# Altium PCB ControlBoard_PCB.PcbDoc
Units mil, origin at the board's own origin, x right, y up, seen from the top; angles counter-clockwise.
Board outline 1629.92 x 1653.54 mil, 2 copper layers (Top Layer, Bottom Layer), stack 57 mil thick; 80 components, 70 nets, 348 pads, 4 vias.
Unrouted connection lines stored in the file: 222.
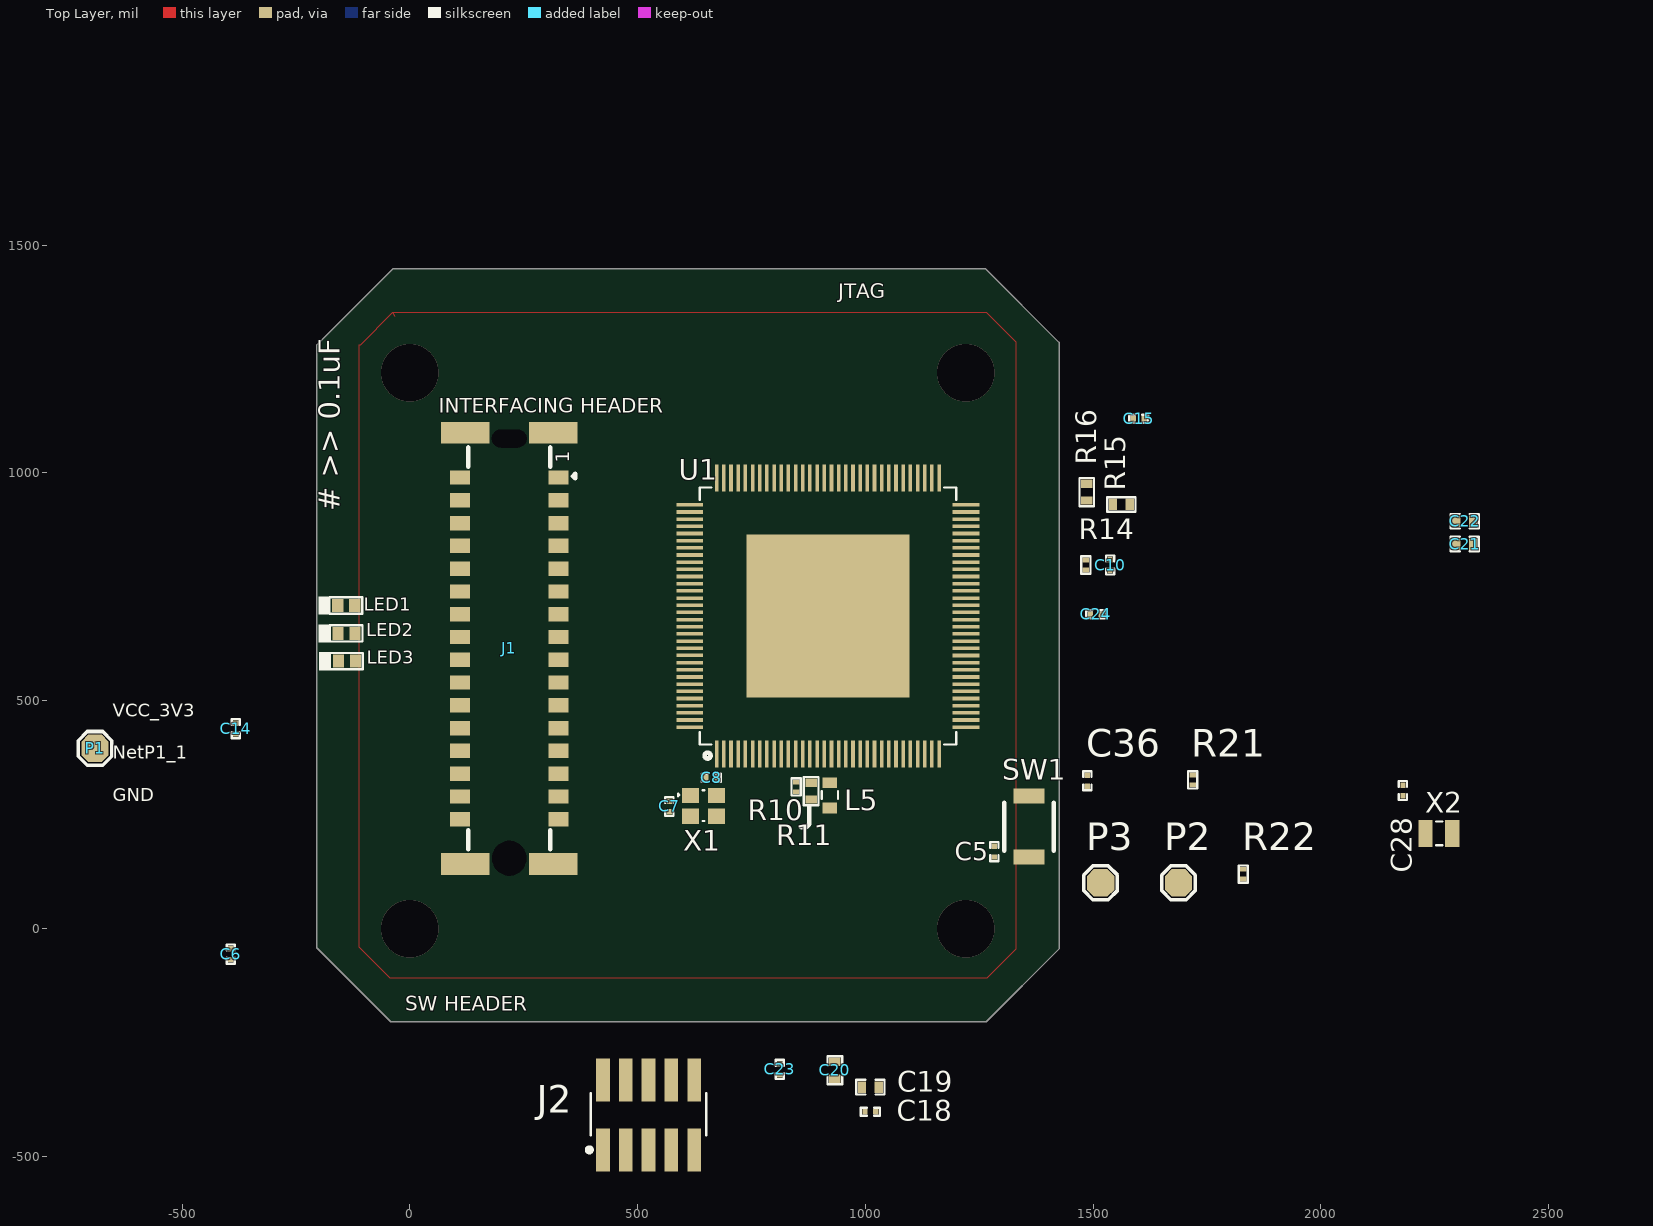
[diagram p0: Top Layer view]
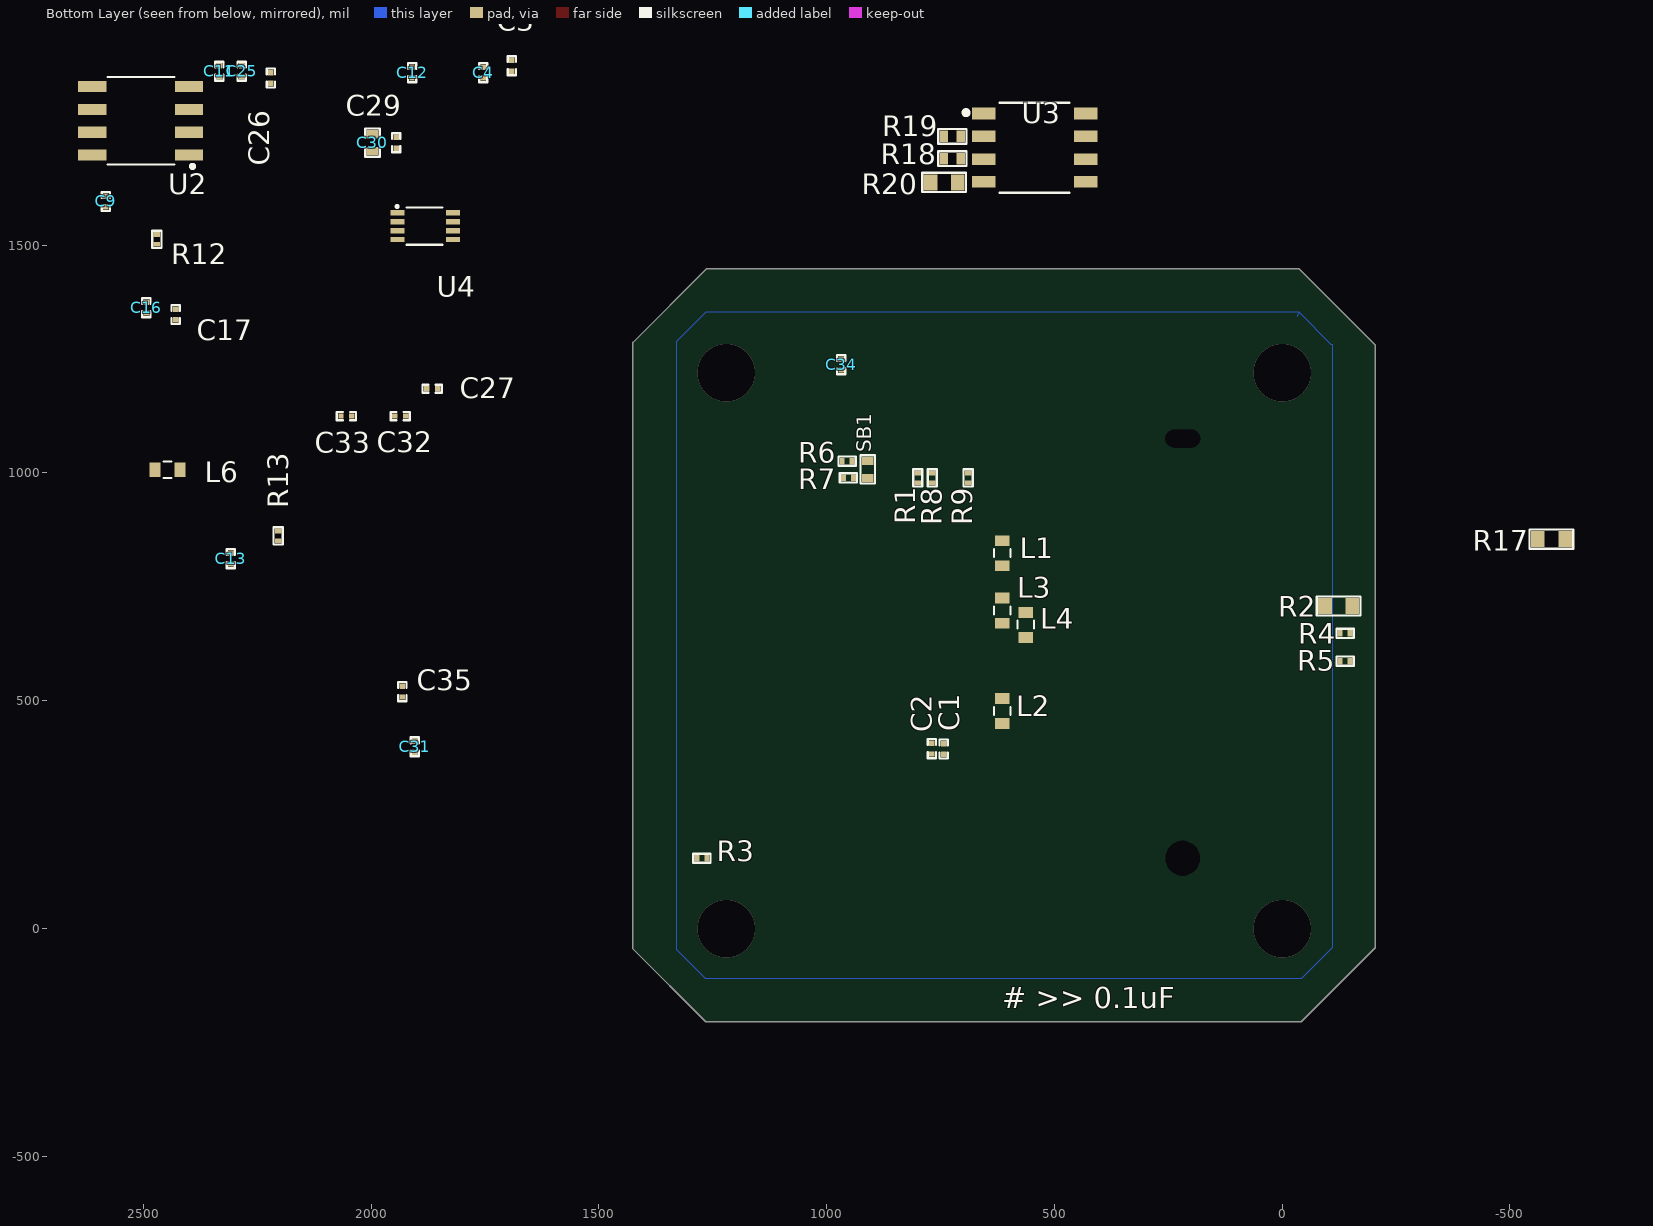
[diagram p1: Bottom Layer view, seen from below]

## Layer stack, top to bottom
Top Solder: solder mask 3, Solder Resist, Dk 3.5
Top Layer: signal copper 10
Dielectric 1: dielectric 37, FR-4, Dk 4.8
Bottom Layer: signal copper 10
Bottom Solder: solder mask 3, Solder Resist, Dk 3.5

## Board outline
-204.72,-43.35 -204.72,1280.28 -36.18,1448.82 1263.11,1448.82 1425.2,1286.73 1425.2,-44.8 1265.28,-204.72 -41.8,-204.72 -203.18,-43.35

## Design rules (kind name [scope] priority, off if disabled: settings)
Clearance Clearance_2 [InDifferentialPairClass('EtherCAT_B_Lines')] p1: gap=7 ignorepadtopadclearanceinfootprint=FALSE except(0: Arc-Hole Track-Hole SMDPad-Hole THPad-Hole Via-Hole Fill-Hole Poly-Hole Region-Hole Text-Hole; 3: Arc-SMDPad Track-SMDPad SMDPad-SMDPad)
Clearance Clearance_1 [InDifferentialPairClass('EtherCAT_A_Lines')] p2: gap=7 ignorepadtopadclearanceinfootprint=FALSE except(0: Arc-Hole Track-Hole SMDPad-Hole THPad-Hole Via-Hole Fill-Hole Poly-Hole Region-Hole Text-Hole; 3: Arc-SMDPad Track-SMDPad SMDPad-SMDPad)
Clearance [All] p3: gap=7 ignorepadtopadclearanceinfootprint=FALSE except(0: Arc-Hole Track-Hole SMDPad-Hole THPad-Hole Via-Hole Fill-Hole Poly-Hole Region-Hole Text-Hole; 3: Arc-SMDPad Track-SMDPad SMDPad-SMDPad)
ComponentClearance [All] p1: gap=4 collisioncheckmode=3 verticalgap=4 showdistances=FALSE
DiffPairsRouting DiffPairsRouting_1 [InDifferentialPairClass('EtherCAT_B_Lines')] p1: maxlimit=10 minlimit=10 mostfreqgap=10 toplayer_minwidth=6 toplayer_maxwidth=22 toplayer_prefwidth=10 bottomlayer_minwidth=6 bottomlayer_maxwidth=22 bottomlayer_prefwidth=10 maxuncoupledlength=500
DiffPairsRouting [InDifferentialPairClass('EtherCAT_A_Lines')] p2: maxlimit=10 minlimit=10 mostfreqgap=10 toplayer_minwidth=6 toplayer_maxwidth=22 toplayer_prefwidth=10 bottomlayer_minwidth=6 bottomlayer_maxwidth=22 bottomlayer_prefwidth=10 maxuncoupledlength=500
HoleSize [All] p1: absolutevalues=TRUE maxlimit=1000 minlimit=1 maxpercent=80.000 minpercent=20.000
HoleToHoleClearance [All] p1: gap=0 allowstackedmicrovias=TRUE
MatchedLengths "Schematic Matched Net Lengths_1" [InNetClass('EtherCAT_A')] p1: tolerance=25.4 checknetsindiffpair=FALSE checkdiffpairvsdiffpair=TRUE checkxsignals=TRUE checkothers=TRUE
MatchedLengths "Schematic Matched Net Lengths" [InNetClass('EtherCAT_B')] p2: tolerance=25.4 checknetsindiffpair=FALSE checkdiffpairvsdiffpair=TRUE checkxsignals=TRUE checkothers=TRUE
MaxMinImpedance "Schematic Impedance Constraint_1" [InNetClass('EtherCAT_A')] p1: minimum=85.00 maximum=95.00
MaxMinImpedance "Schematic Impedance Constraint" [InNetClass('EtherCAT_B')] p2: minimum=85.00 maximum=95.00
MinimumSolderMaskSliver [All] p1: minsoldermaskwidth=0
PolygonConnect [All] p1: connectstyle=Relief reliefconductorwidth=10 reliefentries=4 polygonreliefangle="90 Angle" airgapwidth=10
RoutingVias [All] p1: holewidth=11.81 width=23.62 viastyle="Through Hole" minholewidth=11.81 minwidth=23.62 maxholewidth=11.81 maxwidth=23.62
SilkToSilkClearance [All] p1: silktosilkclearance=0
SilkToSolderMaskClearance [IsPad] p1: minsilkscreentomaskgap=0 clearancetoexposedcopper=TRUE
SolderMaskExpansion SolderMaskExpansion_1 [IsVia] p1: expansion=4 istentingtop=FALSE soldermaskfromhole=TRUE
SolderMaskExpansion [Not IsVia] p2: expansion=4 istentingtop=FALSE
Width [All] p1: maxlimit=40 minlimit=8 preferedwidth=22
23 further rules are at their usual default settings.

## Classes and differential pairs
component class U_Level-Shifter-Selector: C35 C36 R21 U4
component class U_Connector-Sheet: J1 J2 P2 P3 R22
differential pair class EtherCAT_B_Lines: RXB TXB
differential pair class EtherCAT_A_Lines: RXA TXA
net class EtherCAT_B: RXB_N RXB_P TXB_N TXB_P
net class EtherCAT_A: RXA_N RXA_P TXA_N TXA_P
component class U_Encoder-Sheet: C34 R18 R19 R20 U3
component class U_Coltroller-Part2: C32 C33 L6 R12 R13 R14 R15 R16 R17 U2
component class U_Coltroller-Part1: 42 C1 C2 C3 C4 C5 C6 C7 C8 C9 C10 C11 C12 C13 C14 C15 C16 C17 C18 C19 C20 C21 C22 C23 C24 C25 C26 C27 C29 C30 C31 L1 L2 L3 L4 L5 LED1 LED3 P1 R1 R2 R3 R4 R5 R6 R7 R8 R9 R10 R11 SB1 SW1 U1
differential pair TXB: +TXB_P -TXB_N
differential pair TXA: +TXA_P -TXA_N
differential pair RXB: +RXB_P -RXB_N
differential pair RXA: +RXA_P -RXA_N

## Components (designator, comment, footprint, x,y, rotation, side; value= is the part's Value field where it differs from the comment)
C1 "1uF" Cap-0201 743,394.19 r90 bottom
C2 "100nF" CAP-0201 769,395 r90 bottom
C3 "1uF" Cap-0201 1691,1894 r90 bottom
C4 "100nF" CAP-0201 1753.72,1879 r90 bottom
C5 "100nF" CAP-0201 1283,169 r90 top
C6 "1uF" Cap-0201 -393,-56.12 r270 top
C7 "10pF" CAP-0201 570,268 r270 top
C8 "10pF" CAP-0201 661.81,331 r0 top
C9 "100nF" CAP-0201 2582,1596 r90 bottom
C10 "100nF" CAP-0201 1537,798 r270 top
C11 "100nF" CAP-0201 2333,1882 r270 bottom
C12 "100nF" CAP-0201 1910,1879 r270 bottom
C13 "100nF" CAP-0201 2308,812 r90 bottom
C14 "100nF" CAP-0201 -382,439 r90 top
C15 "100nF" CAP-0201 1600,1119 r0 top
C16 "100nF" CAP-0201 2493,1363 r270 bottom
C17 "100nF" CAP-0201 2429,1348 r270 bottom
C18 "100nF" CAP-0201 1011,-402 r180 top
C19 "4.7uF" Cap-0402 1011,-348 r180 top
C20 "10uF" Cap-0402 933,-311 r270 top
C21 "4.7uF" Cap-0402 2315.5,844 r180 top
C22 "4.7uF" Cap-0402 2315.5,894 r180 top
C23 "100nF" CAP-0201 812,-309 r270 top
C24 "100nF" CAP-0201 1506,690 r0 top
C25 "100nF" CAP-0201 2284,1882 r270 bottom
C26 "100nF" CAP-0201 2220,1867 r270 bottom
C27 "100nF" CAP-0201 1866,1185 r180 bottom
C28 "100nF" CAP-0201 2180,303 r90 top
C29 "1uF" Cap-0201 1945,1725 r90 bottom
C30 "4.7uF" Cap-0402 1997,1725 r90 bottom
C31 "100nF" CAP-0201 1904,399 r90 bottom
C32 "10pF" CAP-0201 1936,1125 r0 bottom
C33 "10pF" CAP-0201 2054,1125 r180 bottom
C34 "100nF" CAP-0201 968,1238 r270 bottom
C35 "100nF" CAP-0201 1931,520 r90 bottom
C36 "100nF" CAP-0201 1487.28,324.47 r90 top
J1 "M55-7013242R" M55-7013242R 218.27,615 r90 top locked
J2 "20021121-00010C4LF" 20021121-00010C4LF_ 524,-408.77 r0 top
L1 "MLB1608-201P1A(f)" "IND-0603 (1608 Metric)" 614.52,823.91 r90 bottom
L2 "MLB1608-201P1A(f)" "IND-0603 (1608 Metric)" 614.52,477.46 r90 bottom
L3 "MLB1608-201P1A(f)" "IND-0603 (1608 Metric)" 614.52,697.93 r90 bottom
L4 "MLB1608-201P1A(f)" "IND-0603 (1608 Metric)" 563,666.44 r90 bottom
L5 "MLB1608-201P1A(f)" "IND-0603 (1608 Metric)" 922,292.44 r90 top
L6 "MLB1608-201P1A(f)" "IND-0603 (1608 Metric)" 2446.63,1007 r0 bottom
LED1 "Green" LED-0402 -139.5,709 r180 top
LED2 "Green" LED-0402 -139,648 r180 top
LED3 "Green" LED-0402 -138,587 r180 top
P1 "Test Point" "TEST POINT" -691,395.5 r0 top
P2 "TEST POINT" Test-point 1687.28,100.47 r0 top
P3 "TEST POINT" Test-point 1516.28,100.47 r0 top
R1 "10K" Res-0201 800,989.27 r90 bottom
R2 "330R" Res-0603 -124,708 r180 bottom
R3 "10K" Res-0201 1274,154.5 r0 bottom
R4 "1K" Res-0201 -138,648 r180 bottom
R5 "1K" Res-0201 -138,587 r180 bottom
R6 "10K" Res-0201 954.83,1026 r0 bottom
R7 "10K" Res-0201 952.12,989.27 r0 bottom
R8 "10K" Res-0201 768.06,989.27 r270 bottom
R9 "10K" Res-0201 689.32,989.27 r270 bottom
R10 "10K" Res-0201 848,311.17 r270 top
R11 "33R" Res-0402 881,301.5 r270 top
R12 "10K" Res-0201 2470,1513 r270 bottom
R13 "10K" Res-0201 2204,862 r90 bottom
R14 "10K" Res-0201 1484,798 r90 top
R15 "33R" Res-0402 1562,931 r180 top
R16 "33R" Res-0402 1486,958 r90 top
R17 "12.1K" Res-0603 -591,855 r0 bottom
R18 "100R" Res-0402 724,1690 r180 bottom
R19 "100R" Res-0402 724,1739 r180 bottom
R20 "470R" Res0603 742,1638 r180 bottom
R21 "10K" Res-0201 1718.28,326.47 r90 top
R22 "1K" Res-0201 1829.28,119.47 r90 top
SB1 "Solder Bridge 0402" "Solder Bridge 0402" 909.8,1007.77 r90 bottom
SW1 "B3U-1000P" B3U-1000P 1359.28,224.03 r90 top
U1 "LAN9255/ZMX019" LAN9255/ZMX019 917.67,686.12 r90 top
U2 "CAT24C256WI-GT3" CAT24C256WI-GT3 2505.7,1773 r0 bottom
U3 "TLE5012BE5000FUMA1" TLE5012BE5000FUMA1 543,1714 r180 bottom
U4 "TXB0102DCUT" TXB0102DCUT 1881,1542 r180 bottom
X1 "25MHz" Q22FA12800090 616,292 r0 top
X2 "32.768KHZ" "2-SMD, (2.00mm x 1.20mm)" 2259,209 r0 top

## Footprints (in the part's own frame and the unit in brackets; to place one, negate y for a bottom-side part, rotate by r counter-clockwise, add the part's x,y. Pads: shape width x height; smd on the part's side, far side on the other; paste and mask are expansions set on the pad)
"2-SMD, (2.00mm x 1.20mm)" [mm]
  rect 0.8x1.5 smd: 1(-0.75,0) 2(0.75,0)
  silkscreen extent -0.15,-0.66 0.18,0.66, body extent -1,-0.6 1,0.6, height 0.35
20021121-00010C4LF_ [mm]
  rect 0.76x2.4 smd: 1(-2.54,-1.95) 2(-2.54,1.95) 3(-1.27,-1.95) 4(-1.27,1.95) 5(0,-1.95) 6(0,1.95) 7(1.27,-1.95) 8(1.27,1.95) 9(2.54,-1.95) 10(2.54,1.95)
  silkscreen extent -3.43,-2.08 3.23,1.22, body extent -3.17,-2.78 3.18,2.72, height 4.5
B3U-1000P [mm] "SWITCH TACTILE SPST-NO 0.05A 12V"
  rect 0.82x1.72 smd: 1(-1.7,0) 2(1.7,0)
  silkscreen extent -1.35,-1.37 1.32,1.37, body extent -2,-1.26 2,1.24, height 1.6
Cap-0201 [mm]
  rect 0.3x0.3 smd mask+0.055: 1(-0.3,0) 2(0.3,0)
  silkscreen extent -0.53,-0.23 0.53,0.23, body extent -0.3,-0.15 0.3,0.15, height 0.28
CAP-0201 [mm]
  rect 0.3x0.3 smd mask+0.055: 1(-0.3,0) 2(0.3,0)
  silkscreen extent -0.53,-0.23 0.53,0.23, body extent -0.3,-0.15 0.3,0.15, height 0.28
Cap-0402 [mil]
  rect 18x25 smd mask+2.36: 1(-18.5,0) 2(18.5,0)
  silkscreen extent -31,-16 31,16, body extent -20,-10 20,10, height 19
CAT24C256WI-GT3 [mm]
  rect 1.57x0.62 smd: 1(-2.7,1.905) 2(-2.7,0.635) 3(-2.7,-0.635) 4(-2.7,-1.905) 5(2.7,-1.905) 6(2.7,-0.635) 7(2.7,0.635) 8(2.7,1.905)
  silkscreen extent -3,-2.44 1.85,2.64, body extent -3,-2.45 3,2.45, height 1.75
"IND-0603 (1608 Metric)" [mm] "0.063\" L x 0.032\" W (1.60mm x 0.80mm)"
  rect 0.6x0.8 smd: 1(-0.7,0) 2(0.7,0)
  silkscreen extent -0.2,-0.46 0.23,0.46, body extent -0.8,-0.4 0.8,0.4, height 0.78
LAN9255/ZMX019 [mm]
  rect 1.5x0.2 smd: 1(-7.7,6.2) 2(-7.7,5.8) 3(-7.7,5.4) 4(-7.7,5) 5(-7.7,4.6) 6(-7.7,4.2) 7(-7.7,3.8) 8(-7.7,3.4) 9(-7.7,3) 10(-7.7,2.6) 11(-7.7,2.2) 12(-7.7,1.8) 13(-7.7,1.4) 14(-7.7,1) 15(-7.7,0.6) 16(-7.7,0.2) 17(-7.7,-0.2) 18(-7.7,-0.6) 19(-7.7,-1) 20(-7.7,-1.4) 21(-7.7,-1.8) 22(-7.7,-2.2) 23(-7.7,-2.6) 24(-7.7,-3) 25(-7.7,-3.4) 26(-7.7,-3.8) 27(-7.7,-4.2) 28(-7.7,-4.6) 29(-7.7,-5) 30(-7.7,-5.4) 31(-7.7,-5.8) 32(-7.7,-6.2) 65(7.7,-6.2) 66(7.7,-5.8) 67(7.7,-5.4) 68(7.7,-5) 69(7.7,-4.6) 70(7.7,-4.2) 71(7.7,-3.8) 72(7.7,-3.4) 73(7.7,-3) 74(7.7,-2.6) 75(7.7,-2.2) 76(7.7,-1.8) 77(7.7,-1.4) 78(7.7,-1) 79(7.7,-0.6) 80(7.7,-0.2) 81(7.7,0.2) 82(7.7,0.6) 83(7.7,1) 84(7.7,1.4) 85(7.7,1.8) 86(7.7,2.2) 87(7.7,2.6) 88(7.7,3) 89(7.7,3.4) 90(7.7,3.8) 91(7.7,4.2) 92(7.7,4.6) 93(7.7,5) 94(7.7,5.4) 95(7.7,5.8) 96(7.7,6.2)
  rect 0.2x1.5 smd: 33(-6.2,-7.7) 34(-5.8,-7.7) 35(-5.4,-7.7) 36(-5,-7.7) 37(-4.6,-7.7) 38(-4.2,-7.7) 39(-3.8,-7.7) 40(-3.4,-7.7) 41(-3,-7.7) 42(-2.6,-7.7) 43(-2.2,-7.7) 44(-1.8,-7.7) 45(-1.4,-7.7) 46(-1,-7.7) 47(-0.6,-7.7) 48(-0.2,-7.7) 49(0.2,-7.7) 50(0.6,-7.7) 51(1,-7.7) 52(1.4,-7.7) 53(1.8,-7.7) 54(2.2,-7.7) 55(2.6,-7.7) 56(3,-7.7) 57(3.4,-7.7) 58(3.8,-7.7) 59(4.2,-7.7) 60(4.6,-7.7) 61(5,-7.7) 62(5.4,-7.7) 63(5.8,-7.7) 64(6.2,-7.7) 97(6.2,7.7) 98(5.8,7.7) 99(5.4,7.7) 100(5,7.7) 101(4.6,7.7) 102(4.2,7.7) 103(3.8,7.7) 104(3.4,7.7) 105(3,7.7) 106(2.6,7.7) 107(2.2,7.7) 108(1.8,7.7) 109(1.4,7.7) 110(1,7.7) 111(0.6,7.7) 112(0.2,7.7) 113(-0.2,7.7) 114(-0.6,7.7) 115(-1,7.7) 116(-1.4,7.7) 117(-1.8,7.7) 118(-2.2,7.7) 119(-2.6,7.7) 120(-3,7.7) 121(-3.4,7.7) 122(-3.8,7.7) 123(-4.2,7.7) 124(-4.6,7.7) 125(-5,7.7) 126(-5.4,7.7) 127(-5.8,7.7) 128(-6.2,7.7)
  rect 9.1x9.1 smd: 129(0,0)
  silkscreen extent -7.95,-7.15 7.16,7.15, body extent -8.01,-8.01 8.01,8.01, height 1.1
LED-0402 [mm]
  rect 0.62x0.72 smd: 1(-0.475,0) 2(0.475,0)
  silkscreen extent -0.89,-0.51 1.55,0.51, body extent -0.5,-0.25 0.51,0.25, height 0.45
M55-7013242R [mm]
  rect 0.8x1.1 smd: A1(9.525,-2.75) A2(8.255,-2.75) A3(6.985,-2.75) A4(5.715,-2.75) A5(4.445,-2.75) A6(3.175,-2.75) A7(1.905,-2.75) A8(0.635,-2.75) A9(-0.635,-2.75) A10(-1.905,-2.75) A11(-3.175,-2.75) A12(-4.445,-2.75) A13(-5.715,-2.75) A14(-6.985,-2.75) A15(-8.255,-2.75) A16(-9.525,-2.75) B1(9.525,2.75) B2(8.255,2.75) B3(6.985,2.75) B4(5.715,2.75) B5(4.445,2.75) B6(3.175,2.75) B7(1.905,2.75) B8(0.635,2.75) B9(-0.635,2.75) B10(-1.905,2.75) B11(-3.175,2.75) B12(-4.445,2.75) B13(-5.715,2.75) B14(-6.985,2.75) B15(-8.255,2.75) B16(-9.525,2.75)
  round 0 hole 1 slot 1.95 at 90 deg unplated: MH(11.7,0)
  round 0 hole 1.9 slot 1.95 at 0 deg unplated: MH1(-11.7,0)
  rect 1.2x2.7 smd: MP1(-12.02,-2.45) MP2(-12.02,2.45) MP3(12.02,2.45) MP4(12.02,-2.45)
  silkscreen extent -11.2,-3.68 11.2,2.29, body extent -12.7,-3.6 12.7,3.6, height 8.25
Q22FA12800090 [mm]
  rect 0.95x0.85 smd: 1(0,-1.15) 2(1.45,-1.15) 3(1.45,0) 4(0,0)
  silkscreen extent -0.7,-1.41 0.78,0.29, body extent -0.3,-1.36 1.7,0.24, height 0.65
Res0603 [mil]
  rect 30x35 smd: 1(-30,0) 2(30,0)
  silkscreen extent -48,-21 48,21, body extent -31,-17 31,17, height 18
Res-0201 [mm]
  rect 0.27x0.37 smd mask+0.055: 1(-0.275,0) 2(0.275,0)
  silkscreen extent -0.48,-0.25 0.48,0.25, body extent -0.3,-0.15 0.3,0.15, height 0.29
Res-0402 [mil]
  rect 18x25 smd mask+2.17: 1(-18.5,0) 2(18.5,0)
  silkscreen extent -32,-17 32,16, body extent -23,-11 23,11, height 16
Res-0603 [mil]
  rect 30x35 smd: 1(-30,0) 2(30,0)
  silkscreen extent -48,-21 48,21, body extent -31,-17 31,17, height 18
"Solder Bridge 0402" [mil]
  rect 18x25 smd mask+2.17: 1(-18.5,0) 2(18.5,0)
  silkscreen extent -32,-17 32,16
"TEST POINT" [mil]
  oct 60x60 smd: 1(0,0)
  silkscreen extent -37,-37 37,37
Test-point [mil]
  oct 60x60 smd: 1(0,0)
  silkscreen extent -37,-37 37,37
TLE5012BE5000FUMA1 [mm] "SENSOR ANGLE 360DEG SMD"
  rect 1.31x0.65 smd: 1(-2.845,1.905) 2(-2.845,0.635) 3(-2.845,-0.635) 4(-2.845,-1.905) 5(2.845,-1.905) 6(2.845,-0.635) 7(2.845,0.635) 8(2.845,1.905)
  silkscreen extent -3.96,-2.51 1.93,2.51, body extent -3,-2.45 3,2.45, height 1.75
TXB0102DCUT [mm]
  rect 0.8x0.3 smd: 1(-1.55,0.75) 2(-1.55,0.25) 3(-1.55,-0.25) 4(-1.55,-0.75) 5(1.55,-0.75) 6(1.55,-0.25) 7(1.55,0.25) 8(1.55,0.75)
  silkscreen extent -1.61,-1.04 0.97,1.13, body extent -1.55,-1 1.55,1, height 0.9

## Part data
C1 C3 C6 C29: library part CC0201KRX5R5BB105, "CAP CER 1UF 6.3V X5R 0201", Case Code (Imperial)=0201, Case Code (Metric)=0603, LCSC Part Number=C541330, Manufacturer=Yageo, Max Operating Temperature=85°C, Min Operating Temperature=-55°C, Tolerance=10%, Voltage Rating=6.3V, Capacitance=1uF, Case/Package=0201, Category="Ceramic Capacitors", ComponentLink1Description=http://www.yageo.com/documents/recent/UPY-GPHC_X5R_4V-to-50V_25.pdf?src-supplier=Digi-Key, ComponentLink1URL=http://www.yageo.com/documents/recent/UPY-GPHC_X5R_4V-to-50V_25.pdf?src-supplier=Digi-Key, ComponentLink2Description=https://www.yageo.com/upload/media/product/productsearch/datasheet/mlcc/UPY-GPHC_X5R_4V-to-50V_26.pdf?src-supplier=Digi-Key, ComponentLink2URL=https://www.yageo.com/upload/media/product/productsearch/datasheet/mlcc/UPY-GPHC_X5R_4V-to-50V_26.pdf?src-supplier=Digi-Key, Item Type=Capacitor, Manufacturer Part Number=CC0201KRX5R5BB105, Mount="Surface Mount", Packaging="Cut Tape", Pricing 1="15000=0.00740 (USD)", RoHS=Yes, RoHS Compliant=Yes, Stock 1=600000, Supplier 1="Arrow Electronics", Supplier Part Number 1=CC0201KRX5R5BB105
C2 C4 C5 C9 C10 C11 C12 C13 C14 C15 C16 C17 C18 C23 C24 C25 C26 C27 C28 C31 C34 C35 C36: library part CC0201KRX5R6BB104, "CAP CER 0.1UF 10V X5R 0201", Case Code (Imperial)=0201, Case Code (Metric)=0603, Dielectric=X5R, LCSC Part Number=C190183, Manufacturer=Yageo, Max Operating Temperature=85°C, Min Operating Temperature=-55°C, Resistor Type=Ceramic, Supplier Part Number 1=603-CC201KRX5R6BB104, Tolerance=10%, Voltage Rating=10V, Capacitance=100nF, Case/Package=0201, Category="Ceramic Capacitors", ComponentLink1Description=https://datasheet.ciiva.com/11587/upy-gphc-x5r-4v-to-50v-12-11587190.pdf?src-supplier=Avnet, ComponentLink1URL=https://datasheet.ciiva.com/11587/upy-gphc-x5r-4v-to-50v-12-11587190.pdf?src-supplier=Avnet, Construction=Flat, Depth=0.3mm, Halogen Free="Halogen Free", Height=0.3mm, Lead Free="Lead Free", Length=0.6mm, Manufacturer Part Number=CC0201KRX5R6BB104, Mount="Surface Mount", Packaging="Tape and Reel", Pricing 1="1=0.10000, 10=0.02400, 50=0.02400, 100=0.01900, 1000=0.01100, 10000=0.00900 (USD)", Radiation Hardening=No, RoHS=Yes, RoHS Compliant=Yes, Series=CC, Stock 1=824403, Supplier 1=Mouser, Termination=SMD/SMT, Thickness=0.013inch, Voltage Rating (DC)=10V, Weight=6E-06oz, Width=0.012inch
C7 C8 C32 C33: library part CGA1A2C0G1E100D030BA, "CAP CER 10PF 25V C0G 0201", Case Code (Imperial)=0201, Case Code (Metric)=0603, Dielectric=C0G, LCSC Part Number=C2168728, Manufacturer=TDK, Max Operating Temperature=125°C, Min Operating Temperature=-55°C, Package Quantity=1, Ratings=AEC-Q200, Resistor Type=Ceramic, Supplier Part Number 1=445-9023-1-ND, Voltage Rating=25V, Capacitance=10pF, Case/Package=0201, Category="Ceramic Capacitors", ComponentLink1Description=https://datasheet.ciiva.com/24220/cga1a2c0g1e100d030ba-271838-24220873.pdf?src-supplier=Mouser, ComponentLink1URL=https://datasheet.ciiva.com/24220/cga1a2c0g1e100d030ba-271838-24220873.pdf?src-supplier=Mouser, Depth=0.3mm, Height=0.3mm, Item Type=Capacitor, Length=0.6mm, Manufacturer Part Number=CGA1A2C0G1E100D030BA, Mount="Surface Mount", Packaging="Tape and Reel", Pricing 1="1=0.11000, 10=0.07900, 50=0.04340, 100=0.03540, 500=0.02530, 1000=0.01987, 2500=0.01807, 5000=0.01662 (USD)", RoHS=Yes, RoHS Compliant=Yes, Series=CGA, Stock 1=28695, Supplier 1=Digi-Key, Termination=SMD/SMT, Thickness=0.013inch, Voltage Rating (DC)=25V, Weight=6E-06oz, Width=0.3mm
C19 C21 C22 C30: library part CC0402KRX5R6BB475, "CAP CER 4.7UF 10V X5R 0402", Case Code (Imperial)=0402, Case Code (Metric)=1005, LCSC Part Number=C326586, Manufacturer=Yageo, Max Operating Temperature=85°C, Min Operating Temperature=-55°C, Supplier Part Number 1=3871698, Tolerance=10%, Voltage Rating=10V, Capacitance=4.7uF, Case/Package=0402, Category="Ceramic Capacitors", ComponentLink1Description=http://www.yageo.com/documents/recent/UPY-GPHC_X5R_4V-to-50V_25.pdf?src-supplier=Digi-Key, ComponentLink1URL=http://www.yageo.com/documents/recent/UPY-GPHC_X5R_4V-to-50V_25.pdf?src-supplier=Digi-Key, Manufacturer Part Number=CC0402KRX5R6BB475, Mount="Surface Mount", Packaging="Cut Tape", Pricing 1="10000=0.02310, 50000=0.02100 (GBP)", RoHS=Yes, RoHS Compliant=Yes, Stock 1=20000, Supplier 1=Farnell
C20: library part CL05A106MP5NUNC, "CAP CER 10UF 10V X5R 0402", Case Code (Imperial)=0402, Case Code (Metric)=1005, Dielectric=X5R, LCSC Part Number=C315248, Manufacturer=Samsung, Max Operating Temperature=85°C, Min Operating Temperature=-55°C, Package Quantity=1, Tolerance=20%, Voltage Rating=10V, Capacitance=10uF, Case/Package=0402, Category="Ceramic Capacitors", ComponentLink1Description=https://datasheet.ciiva.com/25721/cl05a106mp5nunc-25721584.pdf?src-supplier=Digi-Key, ComponentLink1URL=https://datasheet.ciiva.com/25721/cl05a106mp5nunc-25721584.pdf?src-supplier=Digi-Key, ComponentLink2Description=https://datasheet.ciiva.com/26838/getdatasheetpartid-745310-26838170.pdf?src-supplier=Verical, ComponentLink2URL=https://datasheet.ciiva.com/26838/getdatasheetpartid-745310-26838170.pdf?src-supplier=Verical, Construction=Flat, Contact Plating=Tin, Depth=0.5mm, Item Type=Capacitor, Lead Free="Lead Free", Length=1mm, Manufacturer Part Number=CL05A106MP5NUNC, Mount="Surface Mount", Packaging="Tape and Reel", Pricing 1="10000=0.02537 (USD)", Radiation Hardening=No, RoHS=Yes, RoHS Compliant=Yes, Series=CL, Stock 1=1729850, Supplier 1=Avnet, Supplier Part Number 1=CL05A106MP5NUNC, Termination=Wraparound, Thickness=0.028inch, Width=0.02inch
J1: "CONN HDR 1.27MM SMD 32POS", Manufacturer=Harwin, Supplier Part Number=855-M55-7013242R, Category=Connectors, Item Type="Connector Header", Manufacturer Part Number=M55-7013242R, Pricing="1=2.13, 10=1.82, 50=1.82, 100=1.63, 1000=1.17, 10000=1.07 (USD)", RoHS=Yes, Stock=1347, Supplier=Mouser
J2: "CONN HEADER SMD 10POS 1.27MM", Color=Black, Contact Resistance=30mR, Current Rating=1A, Insulation Resistance=100MR, LCSC Part Number=C150517, Manufacturer="Amphenol FCI", Max Operating Temperature=85°C, Max Voltage Rating (AC)=125V, Min Operating Temperature=-40°C, Package Quantity=600, Supplier Part Number 1=609-3695-6-ND, ComponentLink1Description=https://www.verical.com/server-webapp/html/getDatasheet?partID=177140&src-supplier=Verical, ComponentLink1URL=https://www.verical.com/server-webapp/html/getDatasheet?partID=177140&src-supplier=Verical, ComponentLink2Description=http://portal.fciconnect.com/Comergent/fci/drawing/20021121.pdf?src-supplier=Avnet, ComponentLink2URL=http://portal.fciconnect.com/Comergent/fci/drawing/20021121.pdf?src-supplier=Avnet, ComponentLink3Description=https://cdn.amphenol-icc.com/media/wysiwyg/files/drawing/20021121.pdf?src-supplier=Digi-Key, ComponentLink3URL=https://cdn.amphenol-icc.com/media/wysiwyg/files/drawing/20021121.pdf?src-supplier=Digi-Key, ComponentLink4Description=http://portal.fciconnect.com/Comergent/fci/drawing/20021121.pdf?src-supplier=Avnet+Europe, ComponentLink4URL=http://portal.fciconnect.com/Comergent/fci/drawing/20021121.pdf?src-supplier=Avnet+Europe, ComponentLink5Description=https://media.digikey.com/pdf/Data%20Sheets/FCI%20PDFs/Minitek%20127_Catalog.pdf?src-supplier=Digi-Key, ComponentLink5URL=https://media.digikey.com/pdf/Data%20Sheets/FCI%20PDFs/Minitek%20127_Catalog.pdf?src-supplier=Digi-Key, ComponentLink6Description=http://portal.fciconnect.com/Comergent//fci/drawing/20021121.pdf?src-supplier=Mouser, ComponentLink6URL=http://portal.fciconnect.com/Comergent//fci/drawing/20021121.pdf?src-supplier=Mouser, Connector Type="Male Pin,Header", Contact Material="Copper Alloy,Copper,Gold", Contact Mating Length=0.12inch, Contact Plating=Gold, Depth=3.4mm, Gender=Male, Housing Color=Black, Housing Material=Thermoplastic, Item Type="Jtag Male Header", Length=6.35mm, Manufacturer Part Number=20021121-00010C4LF, Mount="Surface Mount", Number of Contacts=10, Number of Positions=10, Number of Rows=2, Orientation=Straight, Packaging="Tape and Reel", Pitch=1.27mm, Pricing 1="1=0.87, 10=0.761, 100=0.6563 (USD)", Radiation Hardening=No, REACH SVHC="No SVHC", Row Spacing=0.05inch, Stack Height=3mm, Stock 1=0, Supplier 1=Digi-Key, Termination=Solder, Voltage Rating=125V
L1 L2 L3 L4 L5 L6: "200Ω @ 100MHz 1 1A 300mΩ 0603 Ferrite Beads", Current Rating (Max)=1A, DC Resistance (DCR) (Max)=300mΩ, Impedance @ Frequency="200Ω @ 100MHz", Manufacturer=Meled, ComponentLink1Description=LCSC, ComponentLink1URL=https://www.lcsc.com/product-detail/Ferrite-Beads_Meled-MLB1608-201P1A-f_C45316.html, Number of Lines=1
LED1 LED2 LED3: library part 16-213/GHC-YR1S1/3T, "Green 520~535nm 0402 Light Emitting Diodes (LED) RoHS", LCSC Part Number=C74338, Manufacturer="Everlight Elec", Package=0402, ComponentLink1Description=LCSC, ComponentLink1URL=https://www.lcsc.com/product-detail/Light-Emitting-Diodes-LED_Everlight-Elec-16-213-GHC-YR1S1-3T_C74338.html, Dominant Wavelength / Coordinate rank=520~535nm, Illumination Color=Green, Item Type=LED, Luminous Intensity (IF=20mA)=112~285mcd, Manufacturer Part Number=16-213/GHC-YR1S1/3T, Mounting Type="Surface Mount"
P1: library part "TEST POINT", "Test Point ON"
P2 P3: "Test Point ON", Item Type="TEST POINT"
R1 R3 R6 R7 R8 R9 R10 R12 R13 R14 R21: library part RC0201FR-0710KL, "RES SMD 10K OHM 1% 1/20W 0201", LCSC Part Number=C106225, Manufacturer=Yageo, Package=0201, ComponentLink7Description=LCSC, ComponentLink7URL=https://www.lcsc.com/product-detail/Chip-Resistor-Surface-Mount_YAGEO-RC0201FR-0710KL_C106225.html, Item Type=Resistor, Manufacturer Part Number=RC0201FR-0710KL
R2: library part RC0603JR-07330RL, "RES  SMD 330R 100 mW 0603", Case Code (Imperial)=0603, Case Code (Metric)=1608, LCSC Part Number=C105879, Manufacturer=Yageo, Max Operating Temperature=155°C, Max Power Dissipation=100mW, Min Operating Temperature=-55°C, Package Quantity=5000, Resistance Tolerance=5%, Resistor Type="Thick Film", Supplier Part Number 1=311-330GRCT-ND, Temperature Coefficient=100ppm/°C, Voltage Rating=50V, Case/Package=0603, Category="Chip SMD Resistors", Construction=Rectangular, Depth=0.8mm, Features="Moisture Resistant", Height=0.45mm, Item Type=Resistor, Lead Free="Lead Free", Length=1.6mm, Manufacturer Part Number=RC0603JR-07330RL, Military Standard=Not, Number of Pins=2, Number of Terminations=2, Packaging="Tape and Reel", Power Rating=100mW, Pricing 1="1=0.10000, 10=0.02000, 100=0.00800, 1000=0.00360, 2500=0.00312 (USD)", REACH SVHC="No SVHC", Resistance=330R, RoHS=Yes, RoHS Compliant=Yes, Series=RC, Size Code=0603, Stock 1=1074593, Supplier 1=Digi-Key, Termination=SMD/SMT, Tolerance=5%, Voltage Rating (DC)=50V, Width=0.8mm
R4 R5 R22: library part RC0201FR-071KP, "RES 1K OHM 1% 1/20W 0201", LCSC Part Number=C3953443, Manufacturer=Yageo, Supplier Part Number 1=13-RC0201FR-071KPCT-ND, Manufacturer Part Number=RC0201FR-071KP, Pricing 1="1=0.11000, 10=0.10200, 100=0.03940, 1000=0.01734, 2500=0.01497, 5000=0.01340 (USD)", RoHS=Yes, RoHS Compliant=Yes, Stock 1=4800, Supplier 1=Digi-Key
R11 R15 R16: library part RC0402FR-0733RL, "RES 33 OHM 1% 1/16W 0402", Case Code (Imperial)=0402, Case Code (Metric)=1005, LCSC Part Number=C138002, Manufacturer=Yageo, Max Operating Temperature=155°C, Max Power Dissipation=63mW, Min Operating Temperature=-55°C, Package Quantity=10000, Power Rating=62.5mW, Resistance Tolerance=1%, Resistor Type="Thick Film", Supplier Part Number 1=603-RC0402FR-0733RL, Temperature Coefficient=100ppm/°C, Voltage Rating=50V, Case/Package=0402, Category="Chip SMD Resistors", ComponentLink1Description=https://datasheet.ciiva.com/11819/0900766b80c66297-11819487.pdf?src-supplier=RSComponents, ComponentLink1URL=https://datasheet.ciiva.com/11819/0900766b80c66297-11819487.pdf?src-supplier=RSComponents, ComponentLink2Description=https://datasheet.ciiva.com/24070/pyu-rc0402-51-rohs-l-6-r-8721-24070077.pdf?src-supplier=Mouser, ComponentLink2URL=https://datasheet.ciiva.com/24070/pyu-rc0402-51-rohs-l-6-r-8721-24070077.pdf?src-supplier=Mouser, ComponentLink3Description=https://datasheet.ciiva.com/7849/1018594-7849967.pdf?src-supplier=Element14, ComponentLink3URL=https://datasheet.ciiva.com/7849/1018594-7849967.pdf?src-supplier=Element14, ComponentLink4Description=https://datasheet.ciiva.com/7849/1018594-7849966.pdf?src-supplier=Element14, ComponentLink4URL=https://datasheet.ciiva.com/7849/1018594-7849966.pdf?src-supplier=Element14, ComponentLink5Description=https://datasheet.ciiva.com/15189/getdatasheetpartid-329253-15189431.pdf?src-supplier=Verical, ComponentLink5URL=https://datasheet.ciiva.com/15189/getdatasheetpartid-329253-15189431.pdf?src-supplier=Verical, ComponentLink6Description=https://datasheet.ciiva.com/17070/pyu-rc0402-51-rohs-l-6-r-17070335.pdf?src-supplier=Future+Electronics, ComponentLink6URL=https://datasheet.ciiva.com/17070/pyu-rc0402-51-rohs-l-6-r-17070335.pdf?src-supplier=Future+Electronics, Construction=Rectangular, Depth=0.5mm, Features="Moisture Resistant", Height=0.35mm, Lead Free="Lead Free", Length=1mm, Manufacturer Part Number=RC0402FR-0733RL, Military Standard=Not, Number of Pins=2, Number of Terminations=2, Packaging="Tape and Reel", Pricing 1="1=0.10000, 10=0.01200, 50=0.01200, 100=0.00500, 1000=0.00300, 10000=0.00100 (USD)", REACH SVHC=Unknown, Resistance=33R, RoHS=Yes, RoHS Compliant=Yes, Series=RC, Size Code=0402, Stock 1=1843488, Supplier 1=Mouser, Technology="THICK FILM", Termination=SMD/SMT, Tolerance=1%, Voltage Rating (DC)=50V, Width=0.5mm
R17: library part RT0603CRD0712K1L, "RES SMD 12.1K OHM 1/10W 0603", Case Code (Imperial)=0603, Case Code (Metric)=1608, LCSC Part Number=C705893, Manufacturer=Yageo, Max Operating Temperature=125°C, Max Power Dissipation=100mW, Min Operating Temperature=-55°C, Package Quantity=5000, Resistance=12.1kR, Resistor Type="Thin Film", Supplier Part Number 1=RT0603CRD0712K1L-ND, Temperature Coefficient=25ppm/°C, Tolerance=0.25%, Voltage Rating=75V, Voltage Rating (DC)=50V, Case/Package=0603, Category="Chip SMD Resistors", ComponentLink1Description=https://datasheet.ciiva.com/2590/pyu-rt-1-to-0-05-rohs-l-5-2590806.pdf?src-supplier=Digi-Key, ComponentLink1URL=https://datasheet.ciiva.com/2590/pyu-rt-1-to-0-05-rohs-l-5-2590806.pdf?src-supplier=Digi-Key, ComponentLink2Description=https://datasheet.ciiva.com/8891/pyu-rt-1-to-0-05-rohs-l-4-8891049.pdf?src-supplier=Avnet, ComponentLink2URL=https://datasheet.ciiva.com/8891/pyu-rt-1-to-0-05-rohs-l-4-8891049.pdf?src-supplier=Avnet, ComponentLink3Description=https://datasheet.ciiva.com/12721/pyu-rt-1-to-0-05-rohs-l-4-12721018.pdf?src-supplier=Mouser, ComponentLink3URL=https://datasheet.ciiva.com/12721/pyu-rt-1-to-0-05-rohs-l-4-12721018.pdf?src-supplier=Mouser, Contact Plating=Tin,Matte, Height=0.022inch, Lead Free="Lead Free", Length=0.063inch, Manufacturer Part Number=RT0603CRD0712K1L, Number of Terminations=2, Packaging="Tape and Reel", Power Rating=100mW, Pricing 1="5000=0.06299 (USD)", Radiation Hardening=No, RoHS=Yes, RoHS Compliant=Yes, Series=RT, Supplier 1=Digi-Key, Termination=SMD/SMT, Width=0.031inch
R18 R19: library part RC0402FR-07100RL, "RES 100 OHM 1% 1/16W 0402", Case Code (Imperial)=0402, Case Code (Metric)=1005, LCSC Part Number=C106232, Manufacturer=Yageo, Max Operating Temperature=155°C, Max Power Dissipation=63mW, Min Operating Temperature=-55°C, Power Rating=62.5mW, Resistance Tolerance=1%, Resistor Type="Thick Film", Supplier Part Number 1=603-RC0402FR-07100RL, Temperature Coefficient=100ppm/°C, Voltage Rating=50V, Case/Package=0402, Category="Chip SMD Resistors", ComponentLink1Description=https://datasheet.ciiva.com/11808/0900766b80c66297-11808765.pdf?src-supplier=RSComponents, ComponentLink1URL=https://datasheet.ciiva.com/11808/0900766b80c66297-11808765.pdf?src-supplier=RSComponents, ComponentLink2Description=https://datasheet.ciiva.com/7849/1784430-7849810.pdf?src-supplier=Element14, ComponentLink2URL=https://datasheet.ciiva.com/7849/1784430-7849810.pdf?src-supplier=Element14, ComponentLink3Description=https://datasheet.ciiva.com/28367/1018594-28367226.pdf?src-supplier=Element14, ComponentLink3URL=https://datasheet.ciiva.com/28367/1018594-28367226.pdf?src-supplier=Element14, ComponentLink4Description=https://datasheet.ciiva.com/22747/1018594-22747511.pdf?src-supplier=Element14, ComponentLink4URL=https://datasheet.ciiva.com/22747/1018594-22747511.pdf?src-supplier=Element14, ComponentLink5Description=https://datasheet.ciiva.com/12667/pyu-rc0402-51-rohs-l-6-r-12667957.pdf?src-supplier=Mouser, ComponentLink5URL=https://datasheet.ciiva.com/12667/pyu-rc0402-51-rohs-l-6-r-12667957.pdf?src-supplier=Mouser, ComponentLink6Description=https://datasheet.ciiva.com/15189/getdatasheetpartid-329466-15189335.pdf?src-supplier=Verical, ComponentLink6URL=https://datasheet.ciiva.com/15189/getdatasheetpartid-329466-15189335.pdf?src-supplier=Verical, ComponentLink7Description=https://datasheet.ciiva.com/16740/pyu-rc0402-51-rohs-l-6-r-16740566.pdf?src-supplier=Future+Electronics, ComponentLink7URL=https://datasheet.ciiva.com/16740/pyu-rc0402-51-rohs-l-6-r-16740566.pdf?src-supplier=Future+Electronics, Construction=Rectangular, Depth=0.5mm, Features="Moisture Resistant", Height=0.32mm, Item Type=Resistor, Lead Free="Lead Free", Length=1mm, Manufacturer Part Number=RC0402FR-07100RL, Military Standard=Not, Number of Pins=2, Number of Terminations=2, Packaging="Tape and Reel", Pricing 1="1=0.10000, 10=0.01200, 50=0.01200, 100=0.00500, 1000=0.00300, 2500=0.00200, 10000=0.00100 (USD)", REACH SVHC="No SVHC", Resistance=100R, RoHS=Yes, RoHS Compliant=Yes, Series=RC, Size Code=0402, Stock 1=699545, Supplier 1=Mouser, Technology="THICK FILM", Termination=SMD/SMT, Tolerance=1%, Voltage Rating (DC)=50V, Width=0.5mm
R20: library part ERJ-PA2F4700X, "RES SMD 470 OHM 1% 1/5W 0402", Case Code (Imperial)=0402, Case Code (Metric)=1005, Manufacturer=Panasonic, Max Operating Temperature=155°C, Max Power Dissipation=200mW, Min Operating Temperature=-55°C, Resistor Type="Thick Film", Supplier Part Number 1=P17222CT-ND, Temperature Coefficient=100ppm/°C, Tolerance=1%, Voltage Rating=50V, Case/Package=0402, ComponentLink1Description=http://www.farnell.com/datasheets/2051174.pdf?src-supplier=Element14, ComponentLink1URL=http://www.farnell.com/datasheets/2051174.pdf?src-supplier=Element14, ComponentLink2Description=https://industrial.panasonic.com/ww/system/files/data/download/catalog/id_fixed-resistors_e_1.pdf?src-supplier=Digi-Key, ComponentLink2URL=https://industrial.panasonic.com/ww/system/files/data/download/catalog/id_fixed-resistors_e_1.pdf?src-supplier=Digi-Key, Features="Automotive AEC-Q200", Height=0.016inch, Length=0.039inch, Manufacturer Part Number=ERJ-PA2F4700X, Number of Terminations=2, Packaging="Cut Tape", Power Rating=200mW, Pricing 1="1=0.22, 10=0.183, 100=0.0717, 1000=0.03002, 2500=0.02751, 5000=0.02501 (USD)", REACH SVHC=Unknown, Resistance=470R, RoHS Compliant=Yes, Stock 1=13876, Supplier 1=Digi-Key, Voltage Rating (DC)=50V, Width=0.02inch
SB1: "Solder Bridge ON", Item Type="Solder Bridge", Manufacturer Part Number="Solder Bridge 0402"
SW1: "SWITCH TACTILE SPST-NO 0.05A 12V", Contact Current Rating=50mA, Contact Resistance=100mR, Insulation Resistance=100MR, LCSC Part Number=C231329, Manufacturer=Omron, Max Operating Temperature=70°C, Max Voltage Rating (DC)=12V, Min Operating Temperature=-25°C, Operating Force=1.5N, Package Quantity=1, Ratings="Dust Proof,IP40", Supplier Part Number 1=SW1020DKR-ND, Actuator Length=0.4mm, Actuator Type=Standard, ComponentLink1Description=http://www.farnell.com/datasheets/60838.pdf?src-supplier=Farnell, ComponentLink1URL=http://www.farnell.com/datasheets/60838.pdf?src-supplier=Farnell, ComponentLink2Description=http://www.farnell.com/datasheets/60838.pdf?src-supplier=Element14, ComponentLink2URL=http://www.farnell.com/datasheets/60838.pdf?src-supplier=Element14, ComponentLink3Description=https://omronfs.omron.com/en_US/ecb/products/pdf/en-b3u.pdf?src-supplier=Digi-Key, ComponentLink3URL=https://omronfs.omron.com/en_US/ecb/products/pdf/en-b3u.pdf?src-supplier=Digi-Key, ComponentLink4Description=http://www.omron.com/ecb/products/pdf/en-b3u.pdf?src-supplier=Digi-Key, ComponentLink4URL=http://www.omron.com/ecb/products/pdf/en-b3u.pdf?src-supplier=Digi-Key, ComponentLink5Description=https://www.distrelec.biz/Web/Downloads/he/et/B3U_eng_datasheet.pdf?mime=application%2Fpdf&src-supplier=Distrelec, ComponentLink5URL=https://www.distrelec.biz/Web/Downloads/he/et/B3U_eng_datasheet.pdf?mime=application%2Fpdf&src-supplier=Distrelec, ComponentLink6Description=http://www.onlinecomponents.com/productFiles/mf-OM/en-b3u.pdf?src-supplier=Onlinecomponents.com, ComponentLink6URL=http://www.onlinecomponents.com/productFiles/mf-OM/en-b3u.pdf?src-supplier=Onlinecomponents.com, ComponentLink7Description=https://www.verical.com/server-webapp/html/getDatasheet?partID=552554&src-supplier=Verical, ComponentLink7URL=https://www.verical.com/server-webapp/html/getDatasheet?partID=552554&src-supplier=Verical, ComponentLink8Description=http://www.farnell.com/datasheets/1685550.pdf?src-supplier=Element14, ComponentLink8URL=http://www.farnell.com/datasheets/1685550.pdf?src-supplier=Element14, ComponentLink9Description=http://www.farnell.com/datasheets/2610940.pdf?src-supplier=Farnell, ComponentLink9URL=http://www.farnell.com/datasheets/2610940.pdf?src-supplier=Farnell, ComponentLink10Description=https://www.alliedelec.com/m/d/4c8a9ef82804fc3c241a13c1e298fd73.pdf?src-supplier=Allied+Electronics, ComponentLink10URL=https://www.alliedelec.com/m/d/4c8a9ef82804fc3c241a13c1e298fd73.pdf?src-supplier=Allied+Electronics, Contact Material=Silver, Current Rating=50mA, Depth=2.5mm, Electrical Life=200000Cycles, Height=1.2mm, Illumination Type=Non-Illuminated,Illuminated, Item Type=Switch, Lead Free="Lead Free", Length=4mm, Manufacturer Part Number=B3U-1000P, Max Current Rating=50mA, Mechanical Life=200000Cycles, Mount="Surface Mount", Orientation=Straight, Packaging="Tape and Reel", Pricing 1="1=1, 10=0.961, 25=0.9064, 50=0.7976, 100=0.7251, 250=0.68888, 500=0.67074, 1000=0.52571 (USD)", REACH SVHC=Unknown, Stock 1=116454, Supplier 1=Digi-Key, Switch Function=Off-Mom, Switch Travel=0.15mm, Termination=SMD/SMT, Throw Configuration=SPST, Voltage Rating (DC)=12V, Weight=0.000776oz, Width=3mm
U1: "IC ETHERCAT SLAVE CONTROLLER", Manufacturer=Microchip, Manufacturer Part Number=LAN9255-I/ZMX019, Supplier Part Number 1=150-LAN9255-I/ZMX019-ND, Pricing 1="1=17.76000, 25=16.18480 (USD)", Stock 1=70, Supplier 1=Digi-Key
U2: "IC EEPROM 256KBIT I2C 1MHZ 8SOIC", Case/Package=SOIC, Frequency=400kHz, Manufacturer="ON Semiconductor", Max Operating Temperature=85°C, Max Supply Voltage=5.5V, Min Operating Temperature=-40°C, Min Supply Voltage=1.8V, Nominal Supply Current=3mA, Operating Supply Voltage=5V, Package Quantity=1, Supplier Part Number 1=8080199P, Access Time=900ns, Access Time-Max=900ns, Category=EEPROM, ComponentLink1Description=https://datasheet.ciiva.com/8072/1780696-8072142.pdf?src-supplier=Element14, ComponentLink1URL=https://datasheet.ciiva.com/8072/1780696-8072142.pdf?src-supplier=Element14, ComponentLink2Description=https://datasheet.ciiva.com/46391/1792913-46391371.pdf?src-supplier=Element14, ComponentLink2URL=https://datasheet.ciiva.com/46391/1792913-46391371.pdf?src-supplier=Element14, ComponentLink3Description=https://datasheet.ciiva.com/4859/cat24c256-d-105771-4859816.pdf?src-supplier=Mouser, ComponentLink3URL=https://datasheet.ciiva.com/4859/cat24c256-d-105771-4859816.pdf?src-supplier=Mouser, ComponentLink4Description=https://datasheet.ciiva.com/16427/cat24c256-d-16427973.pdf?src-supplier=Future+Electronics, ComponentLink4URL=https://datasheet.ciiva.com/16427/cat24c256-d-16427973.pdf?src-supplier=Future+Electronics, Contact Plating=Gold, Density=256Kb, Halogen Free="Halogen Free", Height=1.5mm, Interface=I2C,Serial,2-Wire, Lead Free="Lead Free", Length=5mm, Manufacturer Part Number=CAT24C256WI-GT3, Max Frequency=400kHz, Memory Size=256Kb, Memory Type=EEPROM, Mount="Surface Mount", Number of Pins=8, Number of Words=32000, Organization=32KX8, Packaging="Tape and Reel", Pricing 1="100=0.19900, 200=0.19400, 500=0.18900, 1000=0.18400 (GBP)", Radiation Hardening=No, REACH SVHC="No SVHC", RoHS=Yes, RoHS Compliant=Yes, Series=-, Stock 1=300, Supplier 1=RSComponents, Supply Current=3mA, Supply Voltage-Nom=5.5V, Width=4mm, Write Cycle Time-Max (tWC)=5ms, Write Protection=YES
U3: "MAGNETIC ANGLE SENSOR", Manufacturer=Infineon, Manufacturer Part Number=TLE5012BE5000, Package Quantity=2500, Supplier Part Number 1=2238590, Category="Magnetic Sensors", ComponentLink1Description=http://www.mouser.com/ds/2/196/Infineon-TLE5012B_Exxxx-DS-v02_00-en-540142.pdf?src-supplier=Mouser, ComponentLink1URL=http://www.mouser.com/ds/2/196/Infineon-TLE5012B_Exxxx-DS-v02_00-en-540142.pdf?src-supplier=Mouser, Interface=SPI,PWM, Number of Pins=8, Packaging="Tape and Reel", RoHS=Yes, RoHS Compliant=Yes, Series=TLE5012, Supplier 1=RSComponents
U4: "IC TRNSLTR BIDIRECTIONAL US8", Case/Package=VSSOP, High Level Output Current=-20uA, Low Level Output Current=20uA, Manufacturer="Texas Instruments", Max Operating Temperature=85°C, Max Supply Voltage=5.5V, Min Operating Temperature=-40°C, Min Supply Voltage=1.65V, Output Current=50mA, Package Quantity=1, Category="Integrated Circuits (ICs)", ComponentLink1Description=https://datasheet.ciiva.com/4226/sces641b-4226901.pdf?src-supplier=Arrow+Electronics, ComponentLink1URL=https://datasheet.ciiva.com/4226/sces641b-4226901.pdf?src-supplier=Arrow+Electronics, ComponentLink2Description=https://datasheet.ciiva.com/15096/getdatasheetpartid-226009-15096242.pdf?src-supplier=Verical, ComponentLink2URL=https://datasheet.ciiva.com/15096/getdatasheetpartid-226009-15096242.pdf?src-supplier=Verical, ComponentLink3Description=https://datasheet.ciiva.com/14287/txb0102-14287498.pdf?src-supplier=Avnet, ComponentLink3URL=https://datasheet.ciiva.com/14287/txb0102-14287498.pdf?src-supplier=Avnet, ComponentLink4Description=https://datasheet.ciiva.com/14287/txb0102-14287370.pdf?src-supplier=Avnet, ComponentLink4URL=https://datasheet.ciiva.com/14287/txb0102-14287370.pdf?src-supplier=Avnet, ComponentLink5Description=https://datasheet.ciiva.com/6619/txb0102-6619255.pdf?src-supplier=Digi-Key, ComponentLink5URL=https://datasheet.ciiva.com/6619/txb0102-6619255.pdf?src-supplier=Digi-Key, ComponentLink6Description=https://datasheet.ciiva.com/6619/txb0102-6619256.pdf?src-supplier=Digi-Key, ComponentLink6URL=https://datasheet.ciiva.com/6619/txb0102-6619256.pdf?src-supplier=Digi-Key, ComponentLink7Description=https://datasheet.ciiva.com/6619/txb0102-6619257.pdf?src-supplier=Digi-Key, ComponentLink7URL=https://datasheet.ciiva.com/6619/txb0102-6619257.pdf?src-supplier=Digi-Key, Contact Plating=Gold, Data Rate=100Mbps, Height=0.85mm, Lead Free="Lead Free", Length=2.3mm, Logic Function=Translator, Manufacturer Part Number=TXB0102DCUT, Mount="Surface Mount", Number of Bits=2, Number of Channels=2, Number of Inputs=2, Number of Pins=8, Output Type=3-STATE, Packaging="Tape and Reel", Pricing 1="1=0.79330, 10=0.66470, 25=0.65820, 250=0.37450, 500=0.36200, 1000=0.29770, 2500=0.28440 (USD)", Propagation Delay=31ns, Radiation Hardening=No, REACH SVHC="No SVHC", RoHS=Yes, RoHS Compliant=Yes, Series=-, Stock 1=10, Supplier 1="Arrow Electronics", Supplier Part Number 1=TXB0102DCUT, Turn-On Delay Time=7.4ns, Weight=0.000339oz, Width=2mm
X1: library part Q22FA12800090, "CRYSTAL 25.0000MHZ 12PF SMD", LCSC Part Number=C255883, Manufacturer="Seiko Epson", Package=SMD2016-4P, ComponentLink1Description=LCSC, ComponentLink1URL=https://www.lcsc.com/product-detail/Crystals_Seiko-Epson-Q22FA12800090_C255883.html, Item Type=Crystal, Manufacturer Part Number=Q22FA12800090
X2: library part CM8V-T1A-32.768KHZ-6PF-20PPM-TA-QC, "Crystal 32.768KHZ 6.0PF SMD", Manufacturer="Micro Crystal", Supplier Part Number 1=2195-CM8V-T1A-32.768KHZ-6PF-20PPM-TA-QCCT-ND, Manufacturer Part Number=CM8V-T1A-32.768KHZ-6PF-20PPM-TA-QC, Pricing 1="1=0.68000, 10=0.56400, 50=0.50740, 100=0.45100, 500=0.42844 (USD)", RoHS=No, Stock 1=21000, Supplier 1=Digi-Key

## Via types
v1: diameter 125.98, hole 125.98, Top Layer to Bottom Layer, 4 vias

## Nets (pads, with @x,y where several pads share a name; then routed paths per layer and width w, separated by ;. In a path a pad name is that pad's centre, name@x,y a point inside that pad or via, vN(x,y) a via of type N, cw(c..) or ccw(c..) an arc to the next point about the centre after c; other vN are vias at no path point)
#UART_RX: J1.B13 U4.1
#UART_TX: J1.B12 U4.8
CLK_25: R11.2 U1.98
CS: J1.B16 R16.2 U1.101
DIAG: J1.A10 U1.11
DIAG1: J1.B9 U1.68
DIR: J1.B10 U1.2
EEPSIZE: R2.1 U1.89
ENC_CS: R18.1 U1.46
ENC_DATA: R20.1 U1.43 U1.47
ENC_SCK: R19.1 U1.44
ERRLED: R4.1 U1.17
GND: C1.2 C2.2 C3.2 C4.2 C5.2 C6.2 C7.1 C8.1 C9.2 C10.2 C11.2 C12.2 C13.2 C14.2 C15.2 C16.2 C17.2 C18.2 C19.2 C20.2 C21.2 C22.2 C23.2 C24.2 C25.2 C26.2 C27.2 C28.2 C29.2 C30.2 C31.2 C32.1 C33.1 C34.1 C35.1 C36.1 J1.A12 J1.A13 J1.MP1 J1.MP2 J1.MP3 J1.MP4 J2.3 J2.5 J2.9 P3.1 R5.1 R7.2 R8.2 R9.2 R12.2 R17.2 SW1.2 U1.6 U1.15 U1.129 U2.1 U2.2 U2.3 U2.4 U3.7 U4.2 X1.2 X1.4
LINK0: J1.B8 R9.1 U1.95
LINK1: J1.A9 R8.1 U1.90
MISO: J1.A15 U1.26 U1.34
MOSI: J1.A16 U1.33 U1.38
NetL6_1: L6.1 U1.114
NetLED1_2: LED1.2 R2.2
NetLED2_2: LED2.2 R4.2
NetLED3_2: LED3.2 R5.2
NetP1_1: P1.1 U1.4
NetR6_1: R6.1 SB1.2
NetR7_1: R7.1 SB1.1 U1.81
NetR10_1: R10.1 U1.13
NetR11_1: R11.1 U1.14
NetR12_1: R12.1 U2.7
NetR15_1: R15.1 U1.40
NetR16_1: R16.1 U1.42
NetR17_1: R17.1 U1.111
NetR18_2: R18.2 U3.3
NetR19_2: R19.2 U3.2
NetR20_2: R20.2 U3.4
NetR21_1: R21.1 U4.6
NetU1_39: U1.39 U1.64
NetU1_63: U1.63 U1.70
OPTO_IN: J1.B3 U1.127
PHY_IRQn: R1.1 U1.88 U1.99
QSPI_SIO2: U1.24 U1.35
QSPI_SIO3: U1.36 U1.71
RST: C5.1 J2.10 R3.2 SW1.1 U1.21 U1.108
RXA_N: J1.B7 U1.103
RXA_P: J1.B6 U1.104
RXB_N: J1.A8 U1.119
RXB_P: J1.A7 U1.118
SCK: J1.B15 R15.2 U1.41
SCL_: R14.2 U1.83 U2.6
SDA_: R13.2 U1.82 U2.5
STEP: J1.B11 U1.123
SWDCLK: J2.4 R22.1 U1.120
SWDIO: J2.2 U1.121
SWO: J2.6 U1.122
TXA_N: J1.B5 U1.105
TXA_P: J1.B4 U1.106
TXB_N: J1.A6 U1.116
TXB_P: J1.A5 U1.115
UART_RX: U1.27 U4.4
UART_TX: U1.25 U4.5
VCC_3V3: C1.1 C2.1 C11.1 C12.1 C13.1 C14.1 C15.1 C16.1 C17.1 C18.1 C19.1 C20.1 C21.1 C34.2 C36.2 J1.B1 J1.B2 J2.1 L1.1 L2.1 L4.1 L5.1 LED1.1 LED2.1 LED3.1 P2.1 R1.2 R3.1 R6.2 R10.2 R13.1 R14.1 R21.2 R22.2 U1.7 U1.29 U1.37 U1.45 U1.60 U1.65 U1.74 U1.94 U1.97 U1.117 U2.8 U3.6 U4.3
VDD12: C24.1 C25.1 L3.2 U1.110 U1.113
VDD_5V: C35.2 J1.A11 U4.7
VDD_CORE: C30.1 C31.1 L6.2 U1.109
VDD_CR: C26.1 C27.1 C28.1 C29.1 L3.1 U1.12 U1.52 U1.76
VDDANA: C22.1 C23.1 L5.2 U1.16
VDDBIAS: C10.1 L4.2 U1.112
VDDTXRX1: C3.1 C4.1 C6.1 C9.1 J1.A1 J1.A2 J1.A3 J1.A4 L1.2 L2.2 U1.102 U1.124
XIN32: C32.2 U1.3 X2.1
XOUT32: C33.2 U1.5 X2.2
XTAL_IN: C7.2 U1.128 X1.1
XTAL_OUT: C8.2 U1.1 X1.3
pads on no net: J1.A14 J1.B14 J1.MH J1.MH1 J2.7 J2.8 U1.8 U1.9 U1.10 U1.18 U1.19 U1.20 U1.22 U1.23 U1.28 U1.30 U1.31 U1.32 U1.48 U1.49 U1.50 U1.51 U1.53 U1.54 U1.55 U1.56 U1.57 U1.58 U1.59 U1.61 U1.62 U1.66 U1.67 U1.69 U1.72 U1.73 U1.75 U1.77 U1.78 U1.79 U1.80 U1.84 U1.85 U1.86 U1.87 U1.91 U1.92 U1.93 U1.96 U1.100 U1.107 U1.125 U1.126 U3.1 U3.5 U3.8
copper on no net:
  other v1: 0,0 1220.47,0 0,1220.47 1220.47,1220.47

## Polygon pours and split planes (outlines as drawn)
GND on Top Layer "Polygon_1" (hatched 45Degree grid 25 track 15, remove dead copper, shelved, pour order 2): -33.5,1344.5 -37.1,1352.9 1265.1,1352.9 1330,1288 1330,-45 1266,-109 -43,-109 -110.5,-41.5 -110.5,1282 -108,1282 -37.1,1352.9
GND on Bottom Layer "Polygon_2" (hatched 45Degree grid 25 track 15, remove dead copper, shelved, pour order 1): -33.5,1344.5 -37.1,1352.9 1265.1,1352.9 1330,1288 1330,-45 1266,-109 -43,-109 -110.5,-41.5 -110.5,1282 -108,1282 -37.1,1352.9

## Silkscreen, mask and mechanical layers (free items; w line width, h text height)
Top Overlay:
  lines w10: 859,222 870.28,222 877,228.72 877,266.5
  text "JTAG" at 940,1373 h55
  text "INTERFACING HEADER" at 64,1121 h55
  text "# >> 0.1uF" at -138,916 h80 r90
  text "VCC_3V3" at -652,455 h50
  text "NetP1_1" at -652,362.5 h50
  text "GND" at -652,270 h50
  text "SW HEADER" at -10,-191 h55
Bottom Overlay:
  text "# >> 0.1uF" at 615,-190 h80
Mechanical 2:
  lines w10: -204.72,619.24 415.76,619.24 ; -204.72,-41.8 -204.72,1280.28 ; -204.72,-41.8 -203.18,-43.35 -41.8,-204.72 ; -204.72,-41.8 -204.72,1280.28 ; -204.72,1280.28 -36.18,1448.82 ; -41.8,-204.72 1265.28,-204.72 ; -41.8,-204.72 1265.28,-204.72 ; -36.18,1448.82 1263.11,1448.82 ; -36.18,1448.82 1263.11,1448.82 ; 1263.11,1448.82 1425.2,1286.73 ; 1265.28,-204.72 1425.2,-44.8 ; 1425.2,-44.8 1425.2,1286.73 ; 1425.2,-44.8 1425.2,1286.73

## Dimensions
-36.18,1448.82 to -41.8,-204.72 on Mechanical 1
1425.2,1286.73 to -204.72,1280.28 on Mechanical 1

## Text inside footprints (layer, text, board x,y; h text height)
J1: Top Overlay "1" at 350.27,1023 h30 r90